# Altium PCB PCB1.PcbDoc (part 2 of 2)
Units mm, origin at the board's own origin, x right, y up, seen from the top; angles counter-clockwise.
Board outline 140 x 77.5 mm, 4 copper layers (Top Layer, GND, PWR, Bottom Layer), stack 1.626 mm thick; 200 components, 149 nets, 661 pads, 125 vias.
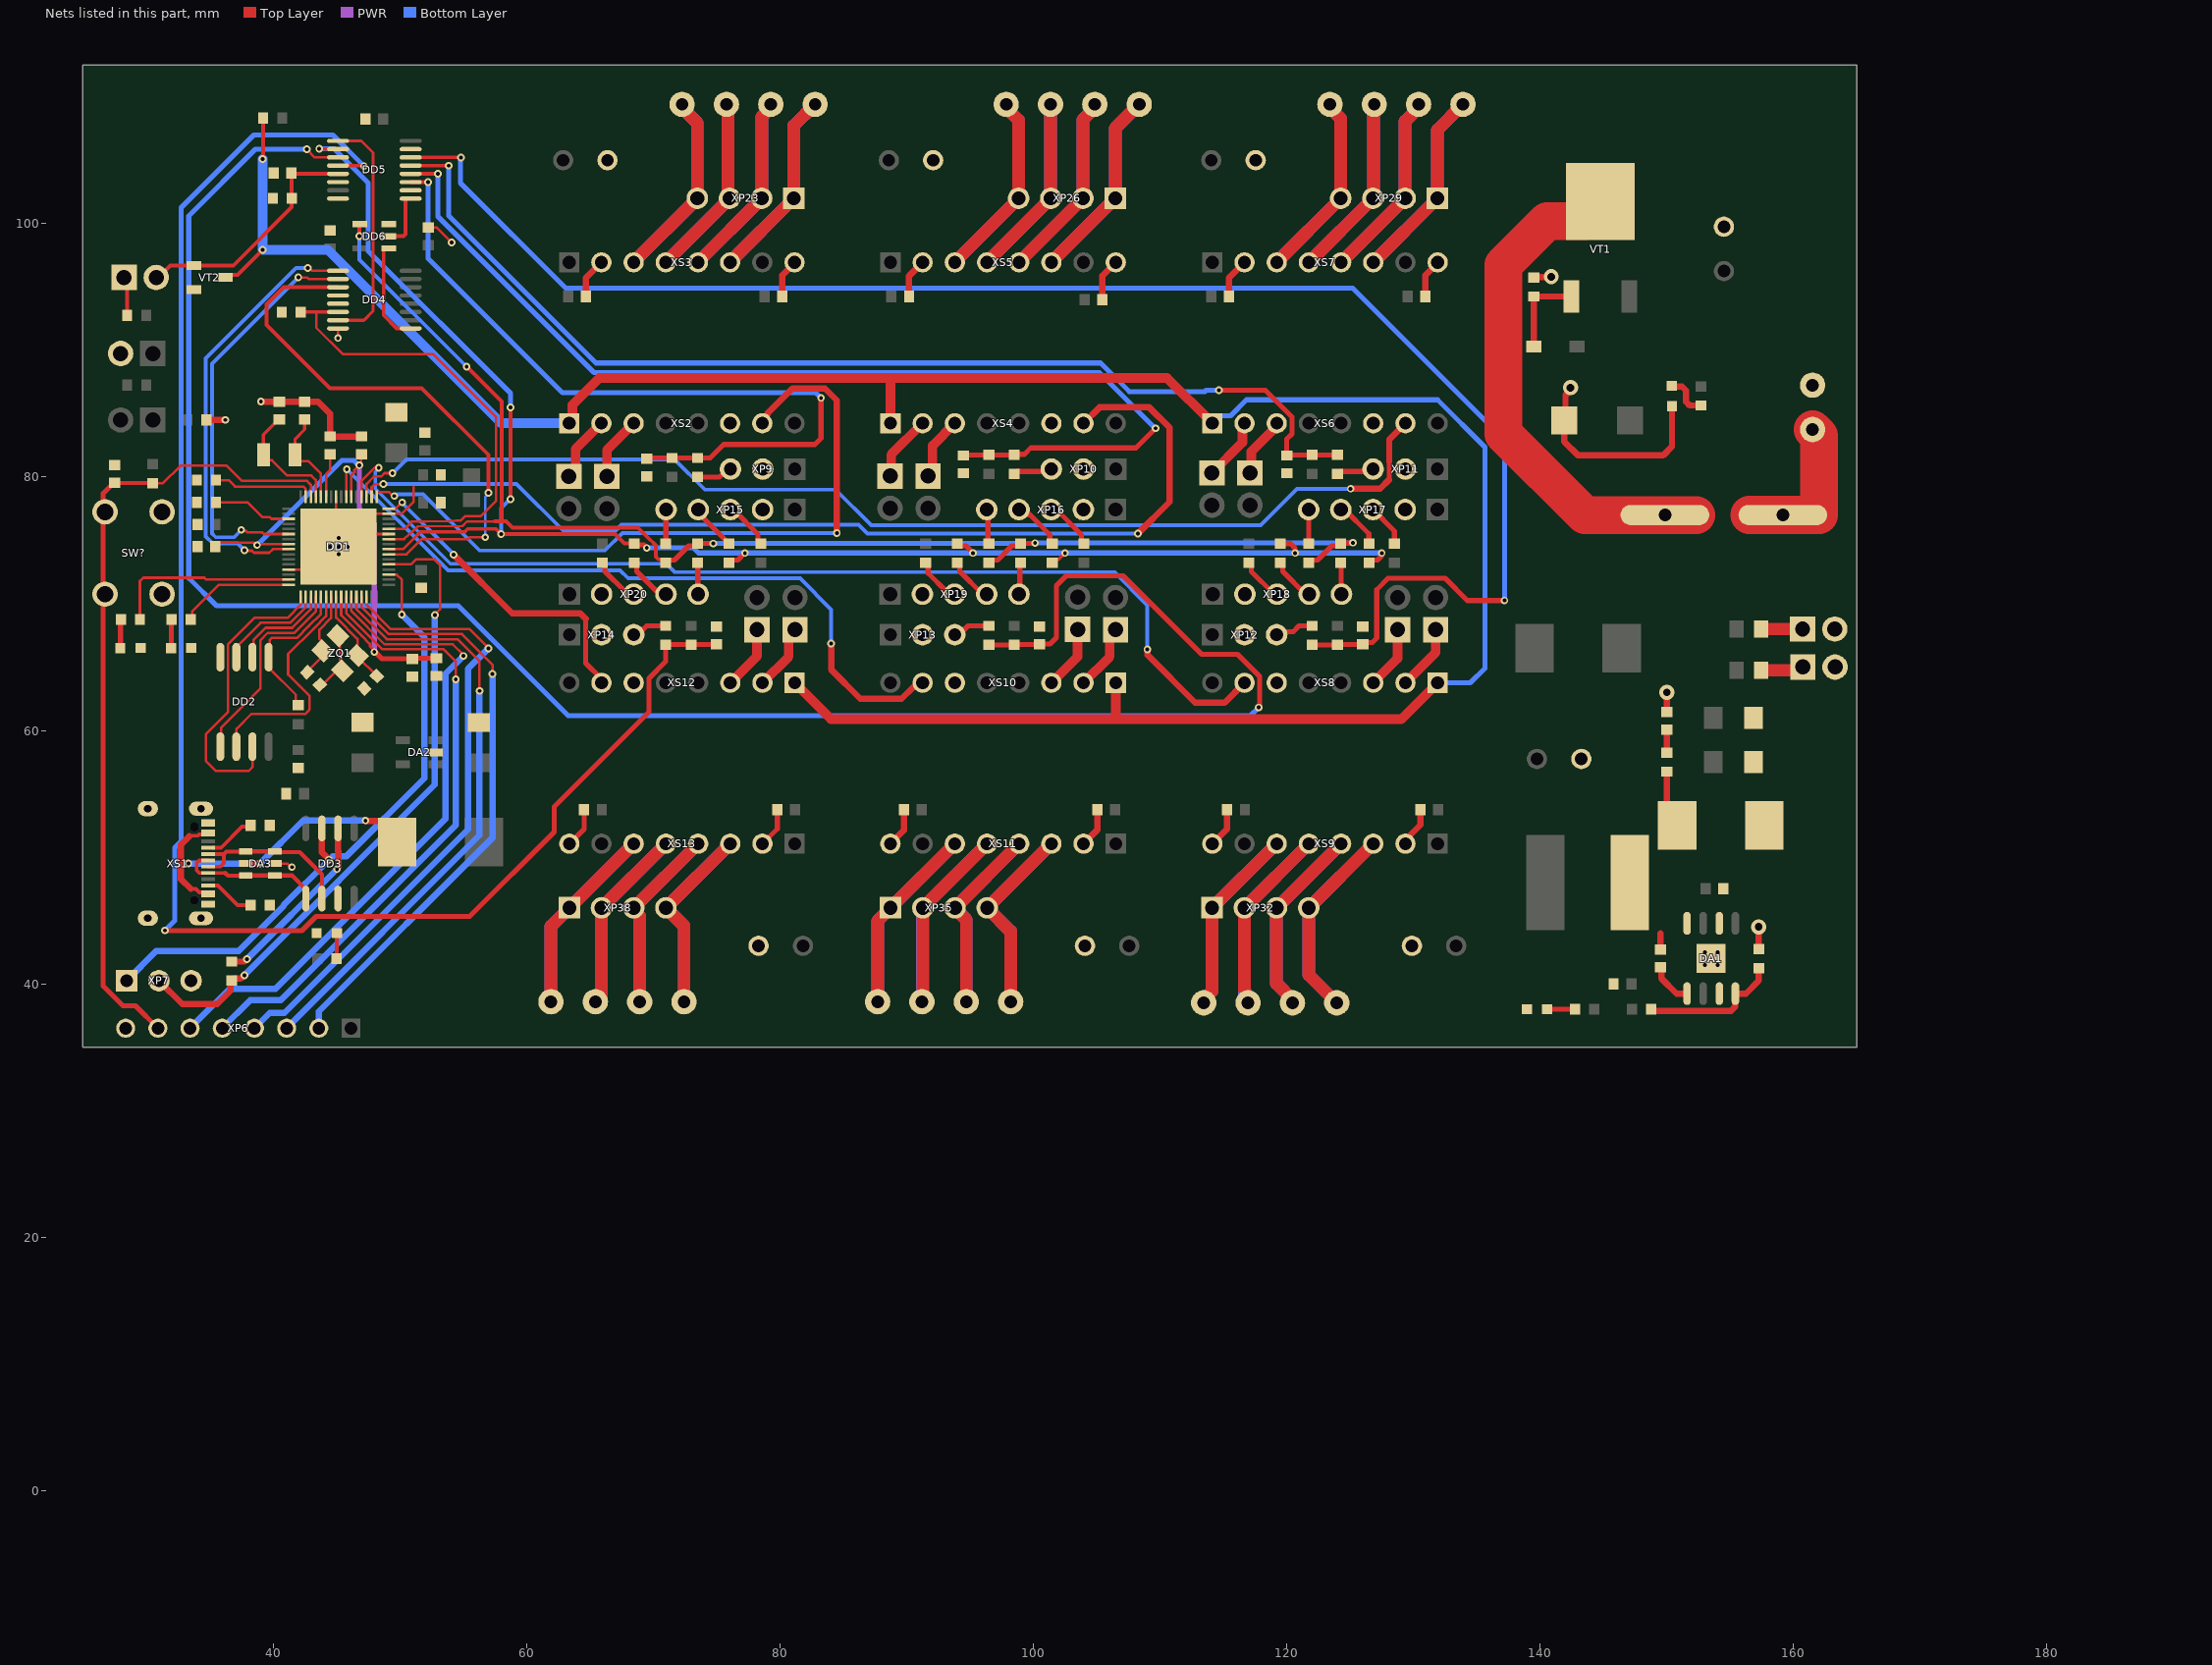
[diagram p4: the nets of this part, all layers, seen from the top]

## Via types
v1: diameter 0.6, hole 0.3, Top Layer to Bottom Layer, 115 vias
v2: diameter 1.2, hole 0.6, Top Layer to Bottom Layer, 7 vias
v3: diameter 1.27, hole 0.711, Top Layer to Bottom Layer, 3 vias

## Nets (pads, with @x,y where several pads share a name; then routed paths per layer and width w, separated by ;. In a path a pad name is that pad's centre, name@x,y a point inside that pad or via, vN(x,y) a via of type N, cw(c..) or ccw(c..) an arc to the next point about the centre after c; other vN are vias at no path point) (continued)
DRV_ENN: R22.1 VT2.2 XS2.1 XS4.1 XS6.1 XS8.1 XS10.1 XS12.1 | length 203.6
  Top Layer w0.3: VT2.2@36.25,95.75 36.45,95.95 37.221,95.95 v1(39.192,97.921) ; v1(39.192,105.092) 39.239,105.139 39.239,108.316 R22.1@39.228,108.327
  Top Layer w0.4: 88.73,87.73 88.75,87.75
  Top Layer w0.75: XS2.1@63.38,84.24 63.63,84.49 63.63,85.68 65.765,87.815 88.685,87.815 ; XS12.1@81.17,63.76 84.031,60.899 106.51,60.899 ; XS4.1@88.73,84.24 88.73,87.73 ; 88.75,87.75 88.685,87.815 ; XS10.1@106.51,63.76 106.51,60.899 ; XS6.1@114.13,84.24 110.555,87.815 88.685,87.815 ; XS8.1@131.91,63.76 129.049,60.899 106.51,60.899
  Bottom Layer w0.4: XS6.1@114.13,84.24 114.73,84.84 115.573,84.84 116.826,86.093 131.907,86.093 135.64,82.36 135.64,64.906 134.494,63.76 XS8.1@131.91,63.76
  Bottom Layer w0.75: v1(39.192,105.092) v1(39.192,97.921) 44.329,97.921 58,84.25 63.37,84.25 XS2.1@63.38,84.24
ESTOP_B: C32.1 DD5.5 R21.1 VT2.1 XP8.2 | length 19.4
  Top Layer w0.3: XP8.2@30.79,95.75 30.941,95.75 31.891,96.7 VT2.1@33.75,96.7 36.881,96.7 41.475,101.294 41.475,101.971 R21.1@41.503,102 41.477,102.027 C32.1@41.477,103.973 ; C32.1@41.45,104 C32.1@41.477,103.973 ; DD5.5@45.134,103.925 41.525,103.925 C32.1@41.477,103.973
EXT_WU: DD1.15 R11.1 | length 8
  Top Layer w0.2: R11.1@35.503,79.75 36.5,79.75 37,79.25 42.411,79.25 42.587,79.074 DD1.15@42.587,78.45
GND: C1.2 C2.2 C3.2 C4.2 C6.2 C7.2 C8.2 C9.2 C10.2 C11.2 C12.2 C13.2 C14.2 C15.2 C16.2 C17.2 C18.2 C19.2 C20.2 C21.2 C22.2 C23.2 C24.2 C25.2 C26.2 C27.2 C28.2 C29.2 C30.2 C31.2 C32.2 C33.2 C34.2 C35.2 C36.2 C37.2 C38.2 C39.2 C40.2 C41.2 C42.2 C43.2 C44.2 C45.2 C46.2 C47.2 C48.2 C49.2 C50.2 C51.2 C52.2 C53.2 C54.2 C55.2 C56.2 DA1.3 DA1.6 DA1.9 DA2.2 DA3.2 DD1.9 DD1.29 DD1.59 DD1.63 DD1.65 DD2.4 DD3.3 DD4.4 DD4.5 DD4.8 DD5.6 DD5.8 DD5.10 DD5.15 DD6.3 HL1.1 HL2.1 HL3.1 HL4.1 HL5.1 R1.2 R5.2 R9.2 R11.2 R12.2 R14.2 R15.2 R19.2 R21.2 SW?.3 SW?.4 VD2.2 VD3.1 VT2.3 XP2.2 XP3.2 XP5.2 XP6.8 XP7.3 XP9.2 XP10.2 XP11.2 XP12.2 XP13.2 XP14.2 XP15.2 XP16.2 XP17.2 XP18.2 XP19.2 XP20.2 XS1.13 XS1.14 XS1.A1B12 XS1.B1A12 XS2.6 XS3.2 XS3.8 XS4.6 XS5.2 XS5.8 XS6.6 XS7.2 XS7.8 XS8.6 XS9.2 XS9.8 XS10.6 XS11.2 XS11.8 XS12.6 XS13.2 XS13.8 XT1.2 ZQ1.2 ZQ1.4 | length 101.3
  Top Layer w0.2: DA3.2@40.149,49.5 41.105,49.5 41.392,49.213 v1(41.5,49.213) ; DD1.29@41.237,72.7 43.387,72.7 v1(45.187,74.5) ; C25.2@43.695,63.605 43.905,63.605 45.021,64.721 ZQ1.4@45.477,64.721 45.477,65.428 45.3,65.605 45.3,66.595 45.123,66.772 ZQ1.2@45.123,67.479 ; DD1.9@44.987,78.45 44.987,74.7 v1(45.187,74.5) ; v1(45.134,90.966) DD4.8@45.134,91.725 ; DD1.65@45.287,73.913 v1(45.187,73.913) v1(45.187,74.5) ; C24.2@46.993,63.305 C24.2@47.205,63.305 ; DD1.59@49.137,75.5 46.187,75.5 47.787,77.1 DD1.63@49.137,77.1 50.153,77.1 51.1,78.047 51.1,79.2 ; C29.2@52.25,99.7 52.9,99.7 v1(54.1,98.5)
  Top Layer w0.4: C27.2@42,57.05 C27.2@42.025,57.025 ; XS13.8@63.39,51.06 64.55,52.22 C56.2@64.55,53.75 ; XS13.2@78.63,51.06 79.8,52.23 C55.2@79.8,53.75 ; XS3.8@81.16,96.88 XS3.8@81.16,96.94 ; XS7.8@131.91,96.88 XS7.8@131.91,96.94 ; R1.2@139.5,95.753 R1.2@139.523,95.777 ; v2@140.852,95.777 v2(140.875,95.8) ; C4.2@154.45,47.5 C4.2@154.475,47.475 ; C3.2@156.843,57.5 C3.2@156.845,57.502 ; C2.2@156.843,60.75 C2.2@156.845,60.748
  Top Layer w0.5: R9.2@34.757,84.5 v1(36.25,84.5) ; v1(39.05,85.95) C22.2@40.5,85.95 C23.2@42.5,85.95 43.55,85.95 44.5,85 C21.2@44.5,83.2 C15.2@47,83.2 ; C40.2@64.7,94.25 64.7,95.72 XS3.2@65.92,96.94 ; C41.2@80.2,94.25 80.2,95.92 XS3.8@81.16,96.88 ; XS11.8@88.73,51.06 89.8,52.13 C53.2@89.8,53.75 ; C43.2@90.2,94.25 90.2,95.87 XS5.2@91.27,96.94 ; XS11.2@103.97,51.06 105.05,52.14 C52.2@105.05,53.75 ; C44.2@105.45,94 105.45,95.88 XS5.8@106.51,96.94 ; XS9.8@114.13,51.06 115.3,52.23 C50.2@115.3,53.75 ; C46.2@115.45,94.25 115.45,95.72 XS7.2@116.67,96.94 ; XS9.2@129.37,51.06 129.37,51.358 129.811,51.799 129.811,51.811 130.55,52.55 C49.2@130.55,53.75 ; C47.2@130.95,94.25 130.95,95.92 XS7.8@131.91,96.88 ; R1.2@139.523,95.777 v2@140.852,95.777 ; VD2.2@141.912,84.463 141.912,82.788 143,81.7 149.7,81.7 150.403,82.403 HL1.1@150.403,85.601 ; VD2.2@142,84.551 142,86.461 142.392,86.853 v2(142.392,87.043) ; C6.2@150,61.45 v2(150,63) ; DA1.6@154.135,44.772 DA1.6@154.135,45.399 ; R5.2@157.25,42.753 v2(157.25,44.5)
  other v1: 44.5,74.5 45.9,74.5 45.2,75.2
JTAG_TCK: DD1.45 XP6.2 | length 47.4
  Top Layer w0.2: DD1.45@46.987,70.55 46.987,69.75 49.137,67.6 51.829,67.6 53.971,67.6 54.912,67.6 57.325,65.187 v1(57.325,64.45)
  Bottom Layer w0.5: XP6.2@43.62,36.5 43.62,37.82 57.35,51.55 57.35,63.136 57.336,63.15 57.336,64.439 v1(57.325,64.45)
JTAG_TDI: DD1.46 XP6.4 | length 50
  Top Layer w0.2: 47.387,69.914 DD1.46@47.387,70.55 ; 47.388,69.914 49.303,68 51.663,68 54.137,68 55.525,68 56.999,66.526 v1(56.999,66.474)
  Bottom Layer w0.5: XP6.4@38.54,36.5 39.74,37.7 40.9,37.7 55.4,52.2 55.4,64.875 v1(56.999,66.474)
JTAG_TDO: DD1.42 XP6.5 | length 49.5
  Top Layer w0.2: DD1.42@45.787,70.55 45.787,69.253 48.64,66.4 52.326,66.4 53.474,66.4 54.425,65.449 v1(54.425,64.025)
  Bottom Layer w0.5: XP6.5@36,36.5 38.2,38.7 40.6,38.7 54.425,52.525 v1(54.425,64.025)
JTAG_TMS: DD1.44 XP6.3 | length 47.6
  Top Layer w0.2: DD1.44@46.587,70.55 46.587,69.584 48.971,67.2 51.994,67.2 53.806,67.2 54.55,67.2 56.3,65.45 v1@56.3,63.142
  Bottom Layer w0.5: XP6.3@41.08,36.5 56.3,51.72 v1(56.3,63.125)
JTAG_TRST: DD1.43 XP6.6 | length 51.9
  Top Layer w0.2: DD1.43@46.187,70.55 46.187,69.419 48.806,66.8 52.16,66.8 53.64,66.8 54.176,66.8 55.026,65.951 v1(55.026,65.876)
  Bottom Layer w0.5: XP6.6@33.46,36.5 36.56,39.6 40.2,39.6 53.625,53.025 53.625,64.475 v1(55.026,65.876)
LED_ERR: DD1.32 R18.1 | length 9.2
  Top Layer w0.2: R18.1@33.507,68.75 33.615,68.858 33.615,69.365 35.75,71.5 DD1.32@41.237,71.5
LED_RUN: DD1.31 R17.1 | length 14.9
  Top Layer w0.2: R17.1@29.503,68.75 29.503,71.783 29.771,72.05 34.591,72.05 34.741,71.9 40.544,71.9 DD1.31@41.237,71.9
LIM1: C33.1 DD5.11 R23.2 R29.1 | length 60.6
  Top Layer w0.3: DD5.11@50.866,103.275 v1(52.25,103.275)
  Top Layer w0.4: C33.1@69.5,81.45 69.527,81.477 69.553,81.503 R29.1@71.5,81.503 R23.2@73.5,81.503 74.503,81.503 75.572,82.572 82.772,82.572 83.25,83.05 v1(83.25,86.24)
  Bottom Layer w0.4: v1(52.25,103.275) 52.25,97.25 62.859,86.641 82.849,86.641 v1(83.25,86.24)
LIM2: C34.1 DD5.12 R24.2 R30.1 | length 85.1
  Top Layer w0.25: R30.1@96.471,81.753 R30.1@96.5,81.753
  Top Layer w0.3: DD5.12@50.866,103.925 v1(53.025,103.925)
  Top Layer w0.4: C34.1@94.5,81.7 C34.1@94.527,81.727 ; C34.1@94.527,81.722 96.471,81.722 R24.2@98.473,81.722 ; R24.2@98.473,81.727 R24.2@98.507,81.727 ; R24.2@98.5,81.748 98.549,81.798 99.298,81.798 99.8,82.3 108.1,82.3 v1(109.65,83.85)
  Bottom Layer w0.4: v1(53.025,103.925) 53.025,100.565 65.34,88.25 105.221,88.25 109.621,83.85 v1(109.65,83.85)
LIM3: C35.1 DD5.13 R25.2 R31.1 | length 87.4
  Top Layer w0.3: DD5.13@50.866,104.575 v1(53.875,104.575)
  Top Layer w0.4: v1(114.647,86.843) 118.304,86.843 120.41,84.737 120.41,83.407 120,82.997 C35.1@120,81.7 120.027,81.727 122,81.727 123.973,81.727 R25.2@124,81.753
  Bottom Layer w0.4: v1(53.875,104.575) 53.875,100.625 65.5,89 105.319,89 107.575,86.744 113.547,86.744 113.646,86.843 v1(114.647,86.843)
LIM4: C36.1 DD5.14 R26.2 R32.1 | length 129.8
  Top Layer w0.3: DD5.14@50.866,105.225 54.829,105.225 v1(54.836,105.218)
  Top Layer w0.4: R26.2@122,66.747 R32.1@124,66.747 ; R32.1@124,66.773 C36.1@125.947,66.773 ; C36.1@126,66.8 125.973,66.773 C36.1@125.947,66.773 ; v1(137.184,70.254) 134.246,70.254 132.5,72 128,72 127.1,71.1 127.1,67.276 126.761,66.937 126.111,66.937 C36.1@125.947,66.773
  Bottom Layer w0.4: v1@54.809,105.191 54.809,103.204 63.113,94.9 125.2,94.9 137.184,82.916 v1(137.184,70.254)
LIM5: C37.1 DD5.3 R27.2 R33.1 | length 163.8
  Top Layer w0.2: v1(42.664,105.867) 43.306,105.225 DD5.3@45.134,105.225
  Top Layer w0.4: R27.2@96.5,66.747 R33.1@98.5,66.747 ; R33.1@98.5,66.773 100.473,66.773 C37.1@100.5,66.8 ; C37.1@100.5,66.809 101.316,66.809 101.829,67.322 101.829,71.429 102.6,72.2 107.1,72.2 113.3,66 116.127,66 117.87,64.257 117.87,62.033 117.825,61.989 117.825,61.847 v1(117.787,61.809)
  Bottom Layer w0.4: v1(42.664,105.867) 38.607,105.867 33.35,100.61 33.35,72.031 35.541,69.84 54.623,69.84 63.303,61.16 117.138,61.16 v1(117.787,61.809)
LIM6: C38.1 DD5.4 R28.2 R34.1 | length 133.8
  Top Layer w0.3: DD5.4@45.134,104.575 47.147,104.575 v1(47.183,104.539)
  Top Layer w0.4: v1(31.476,44.213) 31.489,44.2 42.288,44.2 43.403,45.314 55.516,45.314 62.187,51.985 62.187,53.979 69.67,61.461 69.67,64.117 71,65.447 R28.2@71,66.747 71.027,66.773 74.973,66.773 C38.1@75,66.8
  Bottom Layer w0.4: v1(31.476,44.213) 32.25,44.987 32.25,50.75 32.75,51.25 32.75,101.25 38.5,107 44.721,107 v1(47.183,104.539)
NetC5_1: C5.1 DA1.8 L1.1 R3.1 VD3.2 | length 5.9
  Top Layer w0.5: C5.1@149.5,42.7 149.5,44 ; R3.1@150,56.747 150,53.315 VD3.2@150.815,52.5
NetC5_2: C5.2 DA1.1 | length 3.4
  Top Layer w0.5: C5.2@149.5,41.3 149.555,41.245 149.555,40.445 150.772,39.228 DA1.1@151.595,39.228
NetC6_1: C6.1 R3.2 | length 1.8
  Top Layer w0.5: R3.2@150,58.253 C6.1@150,60.05
NetC15_1: C15.1 C16.1 C17.1 C18.1 DD1.6 DD1.24 DD1.41 | length 46.7
  Top Layer w0.2: C17.1@35.45,74.5 35.45,74.524 35.75,74.824 38.442,74.824 38.642,74.624 v1(38.75,74.624) ; v1@38.75,74.7 40.666,74.7 40.837,74.7 DD1.24@41.237,74.7 ; DD1.41@45.387,70.55 45.387,69.087 47.008,67.466 47.648,66.826 47.648,66.652 48.002,66.298 v1(48.002,66.19) ; DD1.6@46.187,78.45 46.187,80.128 46.43,80.371 46.43,80.545 v1(46.818,80.932) 46.934,80.932 46.963,80.903 46.963,81.763 C15.1@47,81.8
  Top Layer w0.4: v1(48.002,66.19) 48.056,66.19 48.596,65.65 C16.1@51,65.65 51.05,65.7 C18.1@52.9,65.7
  PWR w0.4: v1(46.818,80.932) 46.818,77.482 48.002,76.298 v1(48.002,66.19)
  Bottom Layer w0.4: v1(38.75,74.624) 45.446,81.32 46.376,81.32 46.764,80.932 v1(46.818,80.932)
NetC21_1: C21.1 DD1.11 | length 3.5
  Top Layer w0.2: DD1.11@44.187,78.45 44.187,79.731 44.187,80.212 44.5,80.525 C21.1@44.5,81.8
NetC22_1: C22.1 DD1.13 ZQ2.1 | length 9.6
  Top Layer w0.2: ZQ2.1@39.25,81.75 39.25,81.717 39.65,81.317 39.933,81.317 41.137,80.113 43.036,80.113 43.387,79.762 DD1.13@43.387,78.45
  Top Layer w0.25: ZQ2.1@39.25,81.75 39.25,83.35 40.45,84.55 C22.1@40.5,84.55
NetC23_1: C23.1 DD1.12 ZQ2.2 | length 7.6
  Top Layer w0.2: ZQ2.2@41.75,81.75 41.75,81.642 42.15,81.242 42.824,81.242 43.787,80.279 DD1.12@43.787,78.45
  Top Layer w0.25: ZQ2.2@41.75,81.75 41.75,83 42.5,83.75 C23.1@42.5,84.55
NetC24_1: C24.1 DD1.40 ZQ1.1 | length 7.6
  Top Layer w0.2: DD1.40@44.987,70.55 44.987,68.913 46.679,67.221 46.679,66.772 46.608,66.701 46.608,65.994 ZQ1.1@46.679,65.923 46.679,65.811 C24.1@48.195,64.295
NetC25_1: C25.1 DD1.39 ZQ1.3 | length 6.9
  Top Layer w0.2: C25.1@42.705,64.595 42.705,64.636 43.921,65.853 ZQ1.3@43.921,66.277 43.921,66.967 43.675,67.213 43.675,67.945 44.587,68.857 DD1.39@44.587,70.55
NetDA1_4: DA1.4 R4.2 R5.1 | length 10.9
  Top Layer w0.5: R4.2@148.876,37.878 155.071,37.878 155.386,38.193 155.386,39.208 DA1.4@155.405,39.228 156.228,39.228 157.25,40.25 R5.1@157.25,41.247
NetDA3_1: DA3.1 DA3.6 DD3.1 XS1.A6 XS1.B6 | length 11.6
  Top Layer w0.3: XS1.A6@34.875,49.75 34.475,49.75 34.18,49.75 33.975,49.545 33.975,48.955 34.18,48.75 36.225,48.75
  Top Layer w0.327: 36.225,48.75 36.45,48.525 DA3.6@37.876,48.525 ; DA3.6@37.851,48.55 DA3.1@40.149,48.55 41.508,48.55 42.595,47.463 DD3.1@42.595,46.732
NetDA3_3: DA3.3 DA3.4 DD3.2 XS1.A7 XS1.B7 | length 13.8
  Top Layer w0.3: XS1.A7@34.875,49.25 35.85,49.25 36.138,49.538 36.138,50.25 XS1.B7@34.875,50.25
  Top Layer w0.327: 36.138,50.25 36.313,50.425 DA3.4@37.876,50.425 ; DA3.4@37.851,50.45 DA3.3@40.149,50.45 40.205,50.394 42.106,50.394 43.865,48.635 DD3.2@43.865,46.732
NetDD3_6: DD3.6 R16.1 | length 14.6
  Top Layer w0.5: R16.1@36.75,41.757 37.733,41.757 37.925,41.948 v1(37.952,41.948) ; v1(45.054,49.05) 45.054,49.077 45.175,49.198 45.175,50.46 45.135,50.5 DD3.6@45.135,52.268
  Bottom Layer w0.5: v1(37.952,41.948) v1(45.054,49.05)
NetDD4_7: DD4.7 DD5.1 | length 18.7
  Top Layer w0.25: DD4.7@45.134,92.375 47.175,92.375 47.9,93.1 47.9,105.6 46.975,106.525 DD5.1@45.134,106.525
NetDD4_9: DD4.9 DD6.1 | length 8.2
  Top Layer w0.3: DD6.1@49.154,98.05 48.831,98.05 48.736,97.955 48.736,92.764 49.767,91.733 50.858,91.733 DD4.9@50.866,91.725
NetDD5_9: DD5.9 DD6.2 | length 4.6
  Top Layer w0.3: DD6.2@49.154,99 50.293,99 50.469,99.176 50.469,101.955 50.489,101.975 DD5.9@50.866,101.975
NetF?_1: F?.1 XT1.1 | length 12.5
  Top Layer w3: F?.1@156.5,77 F?.1@159.15,77 162,77 162,83.25 XT1.1@161.5,83.75
NetF?_2: F?.2 VT1.2 | length 41.1
  Top Layer w3: VT1.2@144.748,101.747 144.748,101.397 143.548,100.197 140.563,100.197 137.1,96.734 137.1,83.4 143.52,76.98 F?.2@152.32,76.98
NetFB2_2: FB2.2 XP2.1 | length 3.3
  Top Layer w1: FB2.2@157.432,68 XP2.1@160.71,68
NetFB3_2: FB3.2 XP3.1 | length 3.4
  Top Layer w0.5: XP3.1@160.48,64.75 XP3.1@160.73,65
  Top Layer w1: FB3.2@157.432,64.75 XP3.1@160.48,64.75
NetHL1_2: HL1.2 R2.2 | length 3.4
  Top Layer w0.5: HL1.2@150.397,87.199 150.452,87.144 151.202,87.144 151.509,86.837 151.509,85.94 151.802,85.647 R2.2@152.671,85.647
NetHL2_2: HL2.2 R6.2 | length 2.2
  Top Layer w0.4: HL2.2@140.549,38.003 140.551,38.002 142.741,38.002 R6.2@142.743,38.003
NetHL3_2: HL3.2 R7.2 | length 2
  Top Layer w0.3: R7.2@45.003,42 45.026,42.023 45.026,43.98 HL3.2@45.049,44.003
NetHL4_2: HL4.2 R17.2 | length 2.3
  Top Layer w0.4: HL4.2@27.951,66.497 27.974,66.52 27.974,68.727 R17.2@27.997,68.75
NetHL5_2: HL5.2 R18.2 | length 2.3
  Top Layer w0.4: HL5.2@31.951,66.497 31.975,66.521 31.975,68.725 R18.2@32,68.75
NetR1_1: R1.1 VD1.2 VT1.1 | length 6.9
  Top Layer w0.5: VD1.2@139.5,90.3 R1.1@139.5,94.247 142.456,94.247 VT1.1@142.462,94.253
NetR14_1: R14.1 XS1.A5 | length 3.7
  Top Layer w0.3: XS1.A5@35.25,50.75 35.912,50.75 37.569,52.407 38.154,52.407 R14.1@38.247,52.5
NetR15_1: R15.1 XS1.B5 | length 4
  Top Layer w0.3: XS1.B5@34.875,47.75 35.65,47.75 37.2,46.2 R15.1@38.247,46.2
NetR20_2: R20.2 XP8.1 | length 3.1
  Top Layer w0.3: XP8.1@28.25,95.75 28.497,95.503 R20.2@28.497,92.75
NetR23_1: R23.1 XP9.3 | length 2.9
  Top Layer w0.4: R23.1@73.5,79.997 75.226,79.997 75.854,80.625 XP9.3@76.11,80.625
NetR24_1: R24.1 XP10.3 | length 3.1
  Top Layer w0.4: R24.1@98.5,80.247 R24.1@98.689,80.436 ; R24.1@98.689,80.431 XP10.3@101.236,80.431 ; XP10.3@101.236,80.436 XP10.3@101.425,80.625
NetR25_1: R25.1 XP11.3 | length 3
  Top Layer w0.4: R25.1@124,80.247 124.189,80.436 126.631,80.436 XP11.3@126.82,80.625
NetR26_1: R26.1 XP12.3 | length 3.1
  Top Layer w0.4: XP12.3@119.207,67.55 119.456,67.799 120.513,67.799 120.968,68.253 R26.1@122,68.253
NetR27_1: R27.1 XP13.3 | length 3
  Top Layer w0.4: XP13.3@93.805,67.55 94.157,67.55 94.86,68.253 R27.1@96.5,68.253
NetR28_1: R28.1 XP14.3 | length 2.8
  Top Layer w0.4: XP14.3@68.471,67.55 68.8,67.55 69.503,68.253 R28.1@70.971,68.253
NetR35_1: R35.1 XP15.3 | length 3.8
  Top Layer w0.4: XP15.3@76.1,77.425 76.325,77.425 78.268,75.482 78.268,74.957 78.471,74.753 R35.1@78.5,74.753
NetR36_1: R36.1 XP15.4 | length 3.7
  Top Layer w0.4: XP15.4@73.56,77.425 73.56,77.165 75.971,74.753 R36.1@76,74.753
NetR37_1: R37.1 XP15.5 | length 2.7
  Top Layer w0.4: R37.1@71,74.753 71.01,74.763 71.01,77.415 XP15.5@71.02,77.425
NetR38_1: R38.1 XP16.3 | length 4
  Top Layer w0.4: XP16.3@101.413,77.425 101.662,77.176 102.074,77.176 103.806,75.444 103.806,74.947 R38.1@104,74.753
NetR39_1: R39.1 XP16.4 | length 4
  Top Layer w0.4: XP16.4@98.873,77.425 99.225,77.425 99.624,77.026 99.724,77.026 101.306,75.444 101.306,74.947 R39.1@101.5,74.753
NetR40_1: R40.1 XP16.5 | length 2.7
  Top Layer w0.4: XP16.5@96.333,77.425 96.417,77.342 96.417,74.837 R40.1@96.5,74.753
NetR41_1: R41.1 XP17.3 | length 3.4
  Top Layer w0.4: XP17.3@126.81,77.425 128.5,75.735 R41.1@128.5,74.753
NetR42_1: R42.1 XP17.4 | length 3.8
  Top Layer w0.4: XP17.4@124.27,77.425 124.575,77.425 126.478,75.522 126.478,74.776 R42.1@126.5,74.753
NetR43_1: R43.1 XP17.5 | length 2.7
  Top Layer w0.4: XP17.5@121.73,77.425 121.74,77.415 121.74,74.763 R43.1@121.75,74.753
NetR44_1: R44.1 XP18.3 | length 3.6
  Top Layer w0.4: R44.1@117,73.247 117.194,73.053 117.194,72.556 119,70.75 XP18.3@119.242,70.75
NetR45_1: R45.1 XP18.4 | length 3.6
  Top Layer w0.4: R45.1@119.5,73.247 119.682,73.064 119.682,72.545 121.478,70.75 XP18.4@121.782,70.75
NetR46_1: R46.1 XP18.5 | length 2.5
  Top Layer w0.4: R46.1@124.25,73.247 124.286,73.211 124.286,70.786 XP18.5@124.322,70.75
NetR47_1: R47.1 XP19.3 | length 3.7
  Top Layer w0.4: R47.1@91.5,73.247 91.694,73.053 91.694,72.421 93.116,70.999 93.541,70.999 XP19.3@93.79,70.75
NetR48_1: R48.1 XP19.4 | length 3.7
  Top Layer w0.4: R48.1@94,73.247 94.194,73.053 94.194,72.556 96,70.75 XP19.4@96.33,70.75
NetR49_1: R49.1 XP19.5 | length 2.6
  Top Layer w0.4: XP19.5@98.87,70.75 98.935,70.815 98.935,73.182 R49.1@99,73.247
NetR50_1: R50.1 XP20.3 | length 3.8
  Top Layer w0.4: R50.1@66,73.247 66.194,73.053 66.194,72.556 67.751,70.999 68.224,70.999 XP20.3@68.473,70.75
NetR51_1: R51.1 XP20.4 | length 3.8
  Top Layer w0.4: R51.1@68.5,73.247 68.694,73.053 68.694,72.556 70.251,70.999 70.764,70.999 XP20.4@71.013,70.75
NetR52_1: R52.1 XP20.5 | length 2.5
  Top Layer w0.4: R52.1@73.5,73.247 73.527,73.22 73.527,70.777 XP20.5@73.553,70.75
NetXP21_1: XP21.1 XS2.2 | length 5.3
  Top Layer w0.75: XP21.1@63.35,80.05 63.876,80.576 63.876,82.196 XS2.2@65.92,84.24
NetXP22_1: XP22.1 XS2.3 | length 5.1
  Top Layer w0.75: XP22.1@66.35,80.05 66.35,82.13 XS2.3@68.46,84.24
NetXP23_1: XP23.1 XS3.6 XT2.1 | length 30.5
  Top Layer w1: XS3.6@76.08,96.94 76.08,96.97 XP23.1@81.11,102 81.11,107.735 XT2.1@82.785,109.41
  Bottom Layer w1: XS3.6@76.08,96.97 XP23.1@81.11,102 81.11,107.735 XT2.1@82.785,109.41
NetXP23_2: XP23.2 XS3.5 XT2.2 | length 29.4
  Top Layer w1: XS3.5@73.54,96.94 73.54,96.955 78.57,101.985 XP23.2@78.57,102 78.57,108.424 79.285,109.139 XT2.2@79.285,109.41
  Bottom Layer w1: XS3.5@73.54,96.955 XP23.2@78.57,101.985 ; XP23.2@78.57,102 78.57,108.424 XT2.2@79.285,109.139
NetXP23_3: XP23.3 XS3.4 XT3.1 | length 28.9
  Top Layer w1: XS3.4@71,96.94 71,96.955 76.03,101.985 XP23.3@76.03,102 75.907,102.123 75.907,109.288 XT3.1@75.785,109.41
  Bottom Layer w1: XS3.4@71,96.955 XP23.3@76.03,101.985 ; XP23.3@75.907,102.123 XT3.1@75.907,109.288
NetXP23_4: XP23.4 XS3.3 XT3.2 | length 29.8
  Top Layer w1: XS3.3@68.46,96.94 68.46,96.955 73.49,101.985 XP23.4@73.49,102 73.49,107.935 72.285,109.139 XT3.2@72.285,109.41
  Bottom Layer w1: XS3.3@68.46,96.955 XP23.4@73.49,101.985 ; XT3.2@72.285,109.139 73.49,107.935 XP23.4@73.49,102
NetXP24_1: XP24.1 XS4.2 | length 5.2
  Top Layer w0.75: XP24.1@88.697,80.073 88.79,80.167 88.79,81.759 XS4.2@91.27,84.24
NetXP25_1: XP25.1 XS4.3 | length 5
  Top Layer w0.75: XP25.1@91.697,80.073 92.057,80.434 92.057,82.487 XS4.3@93.81,84.24
NetXP26_1: XP26.1 XS5.6 XT4.1 | length 30.7
  Top Layer w1: XS5.6@101.43,96.94 101.43,96.965 XP26.1@106.465,102 106.465,107.515 XT4.1@108.36,109.41
  Bottom Layer w1: XS5.6@101.43,96.94 101.43,96.965 XP26.1@106.465,102 106.465,107.515 XT4.1@108.36,109.41
NetXP26_2: XP26.2 XS5.5 XT4.2 | length 29.9
  Top Layer w1: XS5.5@98.89,96.94 98.89,96.952 103.925,101.987 XP26.2@103.925,102 103.925,108.204 104.86,109.139 XT4.2@104.86,109.41
  Bottom Layer w1: XS5.5@98.89,96.94 98.89,96.952 103.925,101.987 XP26.2@103.925,102 103.925,108.204 104.86,109.139 XT4.2@104.86,109.41
NetXP26_3: XP26.3 XS5.4 XT5.1 | length 29.2
  Top Layer w1: XS5.4@96.35,96.94 96.325,96.94 XP26.3@101.385,102 101.372,102.013 101.372,109.398 XT5.1@101.36,109.41
  Bottom Layer w1: XS5.4@96.35,96.94 96.35,96.952 101.385,101.987 XP26.3@101.385,102 101.372,102.013 101.372,109.398 XT5.1@101.36,109.41
NetXP26_4: XP26.4 XS5.3 XT5.2 | length 29.9
  Top Layer w1: XS5.3@93.81,96.94 93.81,96.952 98.845,101.987 XP26.4@98.845,102 98.845,108.155 97.86,109.139 XT5.2@97.86,109.41
  Bottom Layer w1: XS5.3@93.81,96.94 93.81,96.952 98.845,101.987 XP26.4@98.845,102 98.845,108.155 97.86,109.139 XT5.2@97.86,109.41
NetXP27_1: XP27.1 XS6.2 | length 5
  Top Layer w0.75: XP27.1@114.1,80.32 116.507,82.727 116.507,84.077 XS6.2@116.67,84.24
NetXP28_1: XP28.1 XS6.3 | length 4.8
  Top Layer w0.75: XP28.1@117.1,80.32 117.206,80.426 117.206,82.006 119.21,84.01 XS6.3@119.21,84.24
NetXP29_1: XP29.1 XS7.6 XT6.1 | length 30.8
  Top Layer w1: XS7.6@126.83,96.94 126.83,96.945 XP29.1@131.885,102 131.885,107.385 XT6.1@133.91,109.41
  Bottom Layer w1: XS7.6@126.83,96.94 126.83,96.945 XP29.1@131.885,102 131.885,107.385 XT6.1@133.91,109.41
NetXP29_2: XP29.2 XS7.5 XT6.2 | length 30
  Top Layer w1: XS7.5@124.29,96.94 124.29,96.942 129.345,101.997 XP29.2@129.345,102 129.345,108.074 130.41,109.139 XT6.2@130.41,109.41
  Bottom Layer w1: XS7.5@124.29,96.94 124.29,96.942 129.345,101.997 XP29.2@129.345,102 129.345,108.074 130.41,109.139 XT6.2@130.41,109.41
NetXP29_3: XP29.3 XS7.4 XT7.1 | length 29.2
  Top Layer w1: XS7.4@121.75,96.94 121.75,96.942 126.805,101.997 XP29.3@126.805,102 126.857,102.052 126.857,109.358 XT7.1@126.91,109.41
  Bottom Layer w1: XS7.4@121.75,96.94 121.75,96.942 126.805,101.997 XP29.3@126.805,102 126.857,102.052 126.857,109.358 XT7.1@126.91,109.41
NetXP29_4: XP29.4 XS7.3 XT7.2 | length 29.8
  Top Layer w1: XS7.3@119.21,96.94 119.21,96.942 124.265,101.997 XP29.4@124.265,102 124.265,108.285 123.41,109.139 XT7.2@123.41,109.41
  Bottom Layer w1: XS7.3@119.21,96.94 119.21,96.942 124.265,101.997 XP29.4@124.265,102 124.265,108.285 123.41,109.139 XT7.2@123.41,109.41
NetXP30_1: XP30.1 XS8.2 | length 5.2
  Top Layer w0.75: XS8.2@129.37,63.76 131.75,66.14 XP30.1@131.75,67.95
NetXP31_1: XP31.1 XS8.3 | length 5
  Top Layer w0.75: XS8.3@126.83,63.76 128.75,65.68 XP31.1@128.75,67.95
NetXP32_1: XP32.1 XS9.6 XT8.1 | length 29.9
  Top Layer w1: XT8.1@113.45,38.5 113.45,38.771 114.115,39.436 XP32.1@114.115,46 119.175,51.06 XS9.6@119.21,51.06
  Bottom Layer w1: XT8.1@113.45,38.5 113.45,38.771 114.115,39.436 XP32.1@114.115,46 119.175,51.06 XS9.6@119.21,51.06
NetXP32_2: XP32.2 XS9.5 XT8.2 | length 29.6
  Top Layer w1: XT8.2@116.95,38.5 116.759,38.691 116.759,39.398 116.655,39.502 XP32.2@116.655,46 116.672,46 121.732,51.06 XS9.5@121.75,51.06
  Bottom Layer w1: XT8.2@116.95,38.5 116.95,38.771 116.655,39.066 XP32.2@116.655,46 116.672,46 121.732,51.06 XS9.5@121.75,51.06
NetXP32_3: XP32.3 XS9.4 XT9.1 | length 30.4
  Top Layer w1: XT9.1@120.45,38.5 120.45,38.771 119.195,40.026 XP32.3@119.195,46 119.212,46 124.272,51.06 XS9.4@124.29,51.06
  Bottom Layer w1: XT9.1@120.45,38.5 120.45,38.771 119.195,40.026 XP32.3@119.195,46 119.212,46 124.272,51.06 XS9.4@124.29,51.06
NetXP32_4: XP32.4 XS9.3 XT9.2 | length 31.2
  Top Layer w1: XT9.2@123.95,38.5 121.735,40.715 XP32.4@121.735,46 121.752,46 126.812,51.06 XS9.3@126.83,51.06
  Bottom Layer w1: XT9.2@123.95,38.5 121.735,40.715 XP32.4@121.735,46 121.752,46 126.812,51.06 XS9.3@126.83,51.06
NetXP33_1: XP33.1 XS10.2 | length 5.2
  Top Layer w0.75: XS10.2@103.97,63.76 106.035,65.825 106.035,67.497 XP33.1@106.488,67.95
NetXP34_1: XP34.1 XS10.3 | length 5
  Top Layer w0.75: XS10.3@101.43,63.76 103.488,65.818 XP34.1@103.488,67.95
NetXP35_1: XP35.1 XS11.6 XT10.1 | length 30
  Top Layer w1: XT10.1@87.715,38.59 87.715,44.975 XS11.6@93.805,51.065
  Bottom Layer w1: XT10.1@87.715,38.59 87.715,44.975 XP35.1@88.74,46 93.8,51.06 XS11.6@93.81,51.06
NetXP35_2: XP35.2 XS11.5 XT10.2 | length 29.4
  Top Layer w1: XT10.2@91.28,38.59 XP35.2@91.28,46 XS11.5@96.49,51.21
  Bottom Layer w1: XT10.2@91.215,38.59 91.247,38.622 91.247,45.967 XP35.2@91.28,46 91.285,46 96.345,51.06 XS11.5@96.35,51.06
NetXP35_3: XP35.3 XS11.4 XT11.1 | length 29.9
  Top Layer w1: XT11.1@94.715,38.59 94.715,45.064 93.82,45.959 XP35.3@93.82,46 XS11.4@98.91,51.09
  Bottom Layer w1: XT11.1@94.715,38.59 94.715,45.064 93.82,45.959 XP35.3@93.82,46 93.825,46 98.885,51.06 XS11.4@98.89,51.06
NetXP35_4: XP35.4 XS11.3 XT11.2 | length 30.9
  Top Layer w1: XT11.2@98.215,38.59 98.215,44.145 XP35.4@96.36,46 XS11.3@101.554,51.194
  Bottom Layer w1: XT11.2@98.215,38.59 98.215,44.145 XP35.4@96.36,46 96.365,46 101.425,51.06 XS11.3@101.43,51.06
NetXP36_1: XP36.1 XS12.2 | length 5.3
  Top Layer w0.75: XS12.2@78.63,63.76 80.695,65.825 80.695,67.449 XP36.1@81.196,67.95
NetXP37_1: XP37.1 XS12.3 | length 5.1
  Top Layer w0.75: XS12.3@76.09,63.76 78.196,65.866 XP37.1@78.196,67.95
NetXP38_1: XP38.1 XS13.6 XT12.1 | length 30.4
  Top Layer w1: XT12.1@61.94,38.59 61.94,44.55 68.45,51.06 XS13.6@68.47,51.06
  Bottom Layer w1: XT12.1@61.94,38.59 61.94,44.55 XP38.1@63.39,46 68.45,51.06 XS13.6@68.47,51.06
NetXP38_2: XP38.2 XS13.5 XT12.2 | length 29.9
  Top Layer w1: XT12.2@65.5,38.25 65.93,38.68 XP38.2@65.93,46 65.94,46 71,51.06 XS13.5@71.01,51.06
  Bottom Layer w1: XT12.2@65.44,38.59 65.44,38.861 65.93,39.351 XP38.2@65.93,46 65.94,46 71,51.06 XS13.5@71.01,51.06
NetXP38_3: XP38.3 XS13.4 XT13.1 | length 29.6
  Top Layer w1: XT13.1@68.94,38.59 68.94,45.341 68.47,45.811 XP38.3@68.47,46 68.48,46 73.54,51.06 XS13.4@73.55,51.06
  Bottom Layer w1: XT13.1@68.94,38.59 68.94,45.341 68.47,45.811 XP38.3@68.47,46 68.48,46 73.54,51.06 XS13.4@73.55,51.06
NetXP38_4: XP38.4 XS13.3 XT13.2 | length 30.6
  Top Layer w1: XT13.2@72.44,38.345 72.44,44.57 XP38.4@71.01,46 71.02,46 76.08,51.06 XS13.3@76.09,51.06
  Bottom Layer w1: XT13.2@72.44,38.59 72.44,44.57 XP38.4@71.01,46 71.02,46 76.08,51.06 XS13.3@76.09,51.06
NRST: C26.1 DD1.14 R8.1 SW?.1 SW?.2 XP6.7 | length 63.5
  Top Layer w0.2: R8.1@30.5,79.497 R8.1@30.529,79.497 ; R8.1@30.694,79.497 31.297,79.497 32.7,80.9 36.35,80.9 37.537,79.713 42.657,79.713 42.87,79.5 42.987,79.383 DD1.14@42.987,78.45
  Top Layer w0.3: C26.1@27.527,79.523 R8.1@30.473,79.523
  Top Layer w0.4: C26.1@27.527,79.523 C26.1@27.5,79.55 27.45,79.55 26.6,78.7 26.6,39.844 28.167,38.277 29.143,38.277 XP6.7@30.92,36.5 ; R8.1@30.473,79.523 R8.1@30.5,79.497 ; R8.1@30.529,79.497 R8.1@30.694,79.332
SEL_A0: DD1.25 DD4.1 | length 34.7
  Top Layer w0.2: v1(37.748,74.224) 37.795,74.177 38.348,74.177 38.501,74.024 39.708,74.024 39.984,74.3 DD1.25@41.237,74.3 ; v1(42.75,96.5) 42.858,96.5 43.083,96.275 DD4.1@45.134,96.275
  Bottom Layer w0.3: v1(37.748,74.224) 37.74,74.224 37.214,74.75 35.25,74.75 34.7,75.3 34.7,89.369 41.835,96.504 42.746,96.504 v1(42.75,96.5)
SEL_A1: DD1.22 DD4.2 | length 32.7
  Top Layer w0.2: v1(37.5,75.824) 37.577,75.747 37.879,75.747 38.002,75.624 39.164,75.624 39.288,75.5 DD1.22@41.237,75.5 ; v1(42,95.75) 42.692,95.75 42.817,95.625 DD4.2@45.134,95.625
  Bottom Layer w0.3: v1(37.5,75.824) 36.926,75.25 35.49,75.25 35.2,75.54 35.2,88.95 v1(42,95.75)
SEL_A2: DD1.55 DD4.3 | length 44.3
  Top Layer w0.2: DD1.55@49.137,73.9 50.544,73.9 51.744,75.1 55.4,75.1 55.55,75.25 v1(56.75,75.25)
  Top Layer w0.3: DD4.3@45.134,94.975 40.861,94.975 39.5,93.615 39.5,92 44.5,87 51.75,87 57,81.75 v1(57,78.75)
  Bottom Layer w0.2: v1(56.75,75.25) 56.75,78.392 57,78.642 v1(57,78.75)
SEL_EN: DD1.60 DD4.6 R19.1 | length 37.2
  Top Layer w0.2: 43.428,93.025 43.428,91.782 45.51,89.7 52.646,89.7 57.6,84.746 57.6,78.1 57.25,77.75 56.4,76.9 55.155,76.9 54.839,76.584 53.932,76.525 52.057,76.5 51.263,76.49 50.957,76.466 50.391,75.9 DD1.60@49.137,75.9
  Top Layer w0.3: R19.1@42.2,93 42.225,93.025 43.428,93.025 DD4.6@45.134,93.025
SPI0_MISO: DD1.58 DD6.4 R37.2 R40.2 R43.2 R46.2 R49.2 R52.2 | length 115.7
  Top Layer w0.2: DD1.58@49.137,75.1 50.346,75.1 51.42,76.09 54.946,76.125 55.321,76.5 57.5,76.5
  Top Layer w0.3: v1(46.823,99.006) 46.823,99.927 DD6.4@46.846,99.95 ; v1@55.3,88.707 58.05,85.957 58.05,76.5 ; 57.5,76.5 58.05,76.5 ; R37.2@71,73.247 70.747,73.5 70.42,73.5 70.218,73.702 70.218,74.595 70.15,74.663 70.15,74.67 69.769,75.051 69.762,75.051 68.806,76.007 58.893,76.007 58.4,76.5 58.05,76.5
  Top Layer w0.4: R37.2@71,73.247 71.194,73.44 71.69,73.44 72.81,74.56 73.306,74.56 R52.2@73.5,74.753 73.502,74.752 74.748,74.752 v1(74.75,74.75) ; R40.2@96.5,73.247 96.694,73.44 97.19,73.44 98.31,74.56 98.806,74.56 R49.2@99,74.753 99.017,74.77 100.129,74.77 v1(100.146,74.787) ; R43.2@121.75,73.247 121.944,73.44 122.44,73.44 123.56,74.56 124.056,74.56 R46.2@124.25,74.753 124.278,74.782 125.201,74.782 v1(125.229,74.81)
  Bottom Layer w0.3: v1(46.823,99.006) 46.823,97.166 v1(55.282,88.707)
  Bottom Layer w0.4: v1(74.75,74.75) 74.768,74.768 100.116,74.768 100.146,74.798 125.217,74.798 v1(125.229,74.81)
SPI0_SCK: DD1.56 DD5.2 R36.2 R39.2 R42.2 R45.2 R48.2 R51.2 | length 126.7
  Top Layer w0.2: v1(43.653,105.906) v1@43.668,105.891 ; DD5.2@45.119,105.891 DD5.2@45.134,105.875 ; DD1.56@49.137,74.3 50.266,74.3 51.43,75.465
  Top Layer w0.3: v1@43.668,105.891 DD5.2@45.119,105.891 ; 51.43,75.465 51.606,75.64 55.132,75.675 55.357,75.9 57.6,75.9 v1(58,75.5) 65.416,75.5 65.423,75.507 66.577,75.507 66.584,75.5 67,75.5 67.747,74.753 R51.2@68.5,74.753 ; v1(58.75,78.25) v1(58.75,85.5) ; R39.2@101.747,73.247 101.747,73.465 101.782,73.5 102,73.5 v1(102.5,74)
  Top Layer w0.4: R51.2@68.5,74.753 68.618,74.635 69.266,74.635 v1(69.5,74.401) ; R36.2@76,73.247 76.194,73.44 76.69,73.44 v1(77.25,74) ; R48.2@93.797,74.55 R48.2@94,74.753 94.194,74.56 94.69,74.56 v1(95.25,74) ; R45.2@119.5,74.753 119.51,74.743 120.298,74.743 120.664,74.377 v1(120.664,74) ; R42.2@126.5,73.247 126.703,73.45 127.166,73.45 127.462,73.746 127.462,73.962 v1(127.5,74)
  Bottom Layer w0.3: v1(58,75.5) 58,77.549 58.701,78.25 v1(58.75,78.25)
  Bottom Layer w0.4: v1(43.653,105.906) 44.825,105.906 47.524,103.207 47.524,97.83 58.75,86.604 v1(58.75,85.5) ; v1(69.5,74.401) 73.175,74.401 73.575,74 v1(77.25,74) v1(95.25,74) v1(102.5,74) v1(120.664,74) v1(127.5,74)
SPIFI_CS: DD1.37 DD2.1 R13.1 | length 12.3
  Top Layer w0.2: R13.1@41.8,62.053 41.8,62.825 39.655,64.97 DD2.1@39.655,65.78 39.737,65.862 39.737,67.137 39.893,67.293 41.893,67.293 42.84,68.24 42.84,68.241 43.787,69.188 DD1.37@43.787,70.55
SPIFI_D0: DD1.36 DD2.5 | length 16.2
  Top Layer w0.2: DD2.5@35.845,58.72 35.9,58.775 35.9,60.2 39,63.3 39,67.1 39.593,67.693 41.69,67.693 43.387,69.39 DD1.36@43.387,70.55
SPIFI_D1: DD1.35 DD2.2 | length 7.9
  Top Layer w0.2: DD2.2@38.385,65.78 38.467,65.862 38.467,67.133 39.434,68.1 41.514,68.1 42.987,69.573 DD1.35@42.987,70.55
SPIFI_D2: DD1.34 DD2.3 | length 7.9
  Top Layer w0.2: DD2.3@37.115,65.78 37.115,66.59 39.025,68.5 41.349,68.5 42.587,69.738 42.587,70.042
SPIFI_D3: DD1.33 DD2.7 | length 23.3
  Top Layer w0.2: DD2.7@38.385,58.72 38.385,57.102 38.083,56.8 35.5,56.8 34.7,57.6 34.7,59.7 36.46,61.46 36.46,66.805 38.555,68.9 41.183,68.9 42.187,69.904 42.187,70.15 DD1.33@42.187,70.55
SPIFI_SCK: DD1.38 DD2.6 | length 18.7
  Top Layer w0.2: DD2.6@37.115,58.72 37.115,60.115 38.3,61.3 42.556,61.3 42.732,61.476 42.732,61.482 42.9,61.65 42.9,62.7 41.2,64.4 41.2,66.034 43.24,68.074 43.24,68.076 44.187,69.023 DD1.38@44.187,70.55
STEP1: DD1.1 XS2.7 | length 57.3
  Top Layer w0.2: DD1.1@48.187,78.45 48.187,78.8 49.168,78.8 49.47,78.498 v1(49.578,78.498)
  Top Layer w0.5: XS2.7@78.62,84.24 78.62,84.538 79.026,84.944 79.026,85.026 80.99,86.99 83.561,86.99 84.5,86.051 v1@84.5,75.602
  Bottom Layer w0.3: v1(49.578,78.498) 49.659,78.498 49.809,78.648 51.852,78.648 56.3,74.2 66.2,74.2 67.575,75.575 v1(84.5,75.575)
STEP2: DD1.2 XS4.7 | length 80.7
  Top Layer w0.2: DD1.2@47.787,78.45 47.787,78.909 47.787,79.187 48.025,79.425 48.697,79.425 v1(48.725,79.453)
  Top Layer w0.5: XS4.7@103.97,84.24 105.23,85.5 109.147,85.5 110.75,83.897 110.75,78.033 v1(108.25,75.533)
  Bottom Layer w0.3: v1(48.725,79.453) 59.215,79.453 62.918,75.75 67.043,75.75 67.518,76.225 86.226,76.225 86.918,75.533 v1(108.25,75.533)
STEP3: DD1.3 XS6.7 | length 91.2
  Top Layer w0.2: DD1.3@47.387,78.45 47.387,79.074 47.387,79.464 47.973,80.05 48.549,80.05 48.799,80.3 v1(49.437,80.3)
  Top Layer w0.4: 128.09,79.79 128.09,81.193
  Top Layer w0.5: v1(125.041,79.073) 127.373,79.073 128.09,79.79 ; 128.09,81.193 128.09,82.96 XS6.7@129.37,84.24
  Bottom Layer w0.3: v1(49.437,80.3) 50.537,81.4 71.678,81.4 74.078,79 84.4,79 87.217,76.183 117.933,76.183 120.823,79.073 v1(125.041,79.073)
STEP4: DD1.4 XS8.7 | length 83.3
  Top Layer w0.2: DD1.4@46.987,78.45 46.987,79.687 48.025,80.725 v1(48.349,80.725)
  Top Layer w0.5: v1(109.006,66.402) 109.025,66.383 109.025,65.951 112.776,62.2 115.11,62.2 XS8.7@116.67,63.76
  Bottom Layer w0.3: v1(48.349,80.725) 48.349,80.674 48.075,80.399 48.075,79.082 54.007,73.15 71.041,73.15 71.691,72.5 106.387,72.5 109.006,69.881 v1(109.006,66.402)
STEP5: DD1.7 XS10.7 | length 58.4
  Top Layer w0.2: DD1.7@45.787,78.45 45.787,80.576 v1(45.83,80.62)
  Top Layer w0.3: 90.486,63.377 90.535,63.377 90.918,63.76 XS10.7@91.27,63.76
  Top Layer w0.5: v1(84.05,66.85) 84.05,64.806 86.356,62.5 89.609,62.5 90.486,63.377
  Bottom Layer w0.3: v1(45.83,80.62) 53.826,72.624 67.399,72.624 68.023,72 81.595,72 84.05,69.545 v1(84.05,66.85)
STEP6: DD1.64 XS12.7 | length 25.2
  Top Layer w0.2: DD1.64@49.137,77.5 49.7,77.5 50.198,77.998 v1(50.202,77.998)
  Top Layer w0.4: 64.681,68.819 64.681,65.319 65.93,64.07 XS12.7@65.93,63.76
  Top Layer w0.5: v1(54.25,73.875) 58.875,69.25 64.25,69.25 64.681,68.819
  Bottom Layer w0.3: v1(50.202,77.998) 50.202,77.96 54.25,73.913 v1(54.25,73.875)
UART0_RX: DD1.53 R16.2 XP7.2 | length 52
  Top Layer w0.2: DD1.53@49.137,73.1 50.876,73.1 51.276,73.5 52.75,73.5 53.175,73.075 53.175,69.552 52.775,69.152 v1(52.775,69.103)
  Top Layer w0.5: XP7.2@31,40.25 32.85,38.4 35.6,38.4 36.652,39.452 36.652,40.152 R16.2@36.75,40.25 36.903,40.403 37.441,40.403 37.718,40.68 v1(37.745,40.68)
  Bottom Layer w0.5: v1(37.745,40.68) 52.775,55.711 v1(52.775,69.103)
UART0_TX: DD1.51 DD3.7 XP7.1 | length 50.5
  Top Layer w0.2: DD1.51@49.137,72.3 49.537,72.3 49.734,72.3 49.761,72.3 50.173,71.888 50.173,70.668 50.168,70.663 v1(50.168,69.14)
  Top Layer w0.5: DD3.7@43.865,52.268 43.865,50.387 44.425,49.827 v1(44.425,49.8)
  Bottom Layer w0.5: XP7.1@28.46,40.25 30.81,42.6 37.3,42.6 40.853,46.153 40.853,46.228 v1(44.425,49.8) 44.452,49.8 44.702,50.05 45.775,50.05 51.95,56.225 51.95,67.358 v1(50.168,69.14)
VBUS: DA3.5 VD5.1 XS1.A4B9 XS1.B4A9 | length 28.4
  Top Layer w0.3: 33.407,51.657 33.44,51.69 34.095,51.69 34.18,51.775 34.75,51.775 XS1.A4B9@34.875,51.9 ; 33.5,47.5 33.905,47.5 34.18,47.225 34.75,47.225 XS1.B4A9@34.875,47.1
  Top Layer w0.5: v1(33.325,49.5) 32.75,49.5 ; 33.407,51.657 32.75,51 32.75,49.5 ; 33.5,47.5 32.75,48.25 32.75,49.5 ; DA3.5@37.851,49.5 v1(39,49.5) ; v1(47.306,52.885) 47.325,52.866 48.124,52.866 48.13,52.86 48.525,52.86 49.79,51.595 VD5.1@49.79,51.2
  Bottom Layer w0.5: v1(33.325,49.5) v1(39,49.5) 42.385,52.885 v1(47.306,52.885)
VPRG: DD1.19 R12.1 | length 6.3
  Top Layer w0.2: R12.1@35.503,78 38,78 39.176,76.824 39.762,76.824 39.886,76.7 DD1.19@41.237,76.7
pads on no net: DA1. DA1.2 DA1.5 DA2.4 DD1.16 DD1.47 DD1.48 DD1.49 DD1.50 DD1.57 DD1.61 DD3.4 DD5.7 R22.2 XS1. XS1.A8 XS1.B8 XS2.4 XS2.5 XS4.4 XS4.5 XS6.4 XS6.5 XS8.4 XS8.5 XS10.4 XS10.5 XS12.4 XS12.5

## Polygon pours and split planes (outlines as drawn)
+3V3 on PWR "+3V3_L03_P002" (solid, pour order 2): 60.514,95 133.5,95 133.5,53 60.514,52.75 60.514,35 25,35 25,112.5 60.514,112.5
+24V on PWR "+24V_L03_P003" (solid, remove dead copper, pour order 3): 60,112.5 165,112.5 165,46 134,46 134,95.25 60,95.25
+24V on PWR "+24V_L03_P004" (solid, remove dead copper, pour order 4): 60,52.75 60,35 165,35 165,52.75
GND on Top Layer "GND_L01_P012" (solid, pour order 12): 25.242,112.365 165.242,112.365 165.242,34.865 25.242,34.865
+24V on Top Layer "+24V_L01_P008" (solid, pour order 8): 152.25,43.5 153.75,43.5 153.75,49 155.25,49 155.25,62.5 152.25,62.5
NetC5_1 on Top Layer "NETC5_1_L01_P009" (solid, pour order 9): 152.32,43.5 152.32,54.5 143.75,54.5 143.75,43.5
GND on GND "GND_L02_P011" (solid, pour order 11): 25,112.5 165,112.5 165,35 25,35
GND on Bottom Layer "GND_L04_P013" (solid, pour order 13): 25,112.5 165,112.5 165,35 25,35

## Keep-outs
Keep-Out Layer:
  lines w0.254: 189.5,-9 189.5,-5